# Altium PCB Main_PCB_V1R0_XXXXXX.PcbDoc
Units mil, origin at the board's own origin, x right, y up, seen from the top; angles counter-clockwise.
Board outline 6141.73 x 6929.13 mil, 2 copper layers (Top Layer, Bottom Layer), stack 52.66 mil thick; 72 components, 31 nets, 166 pads, 32 vias.
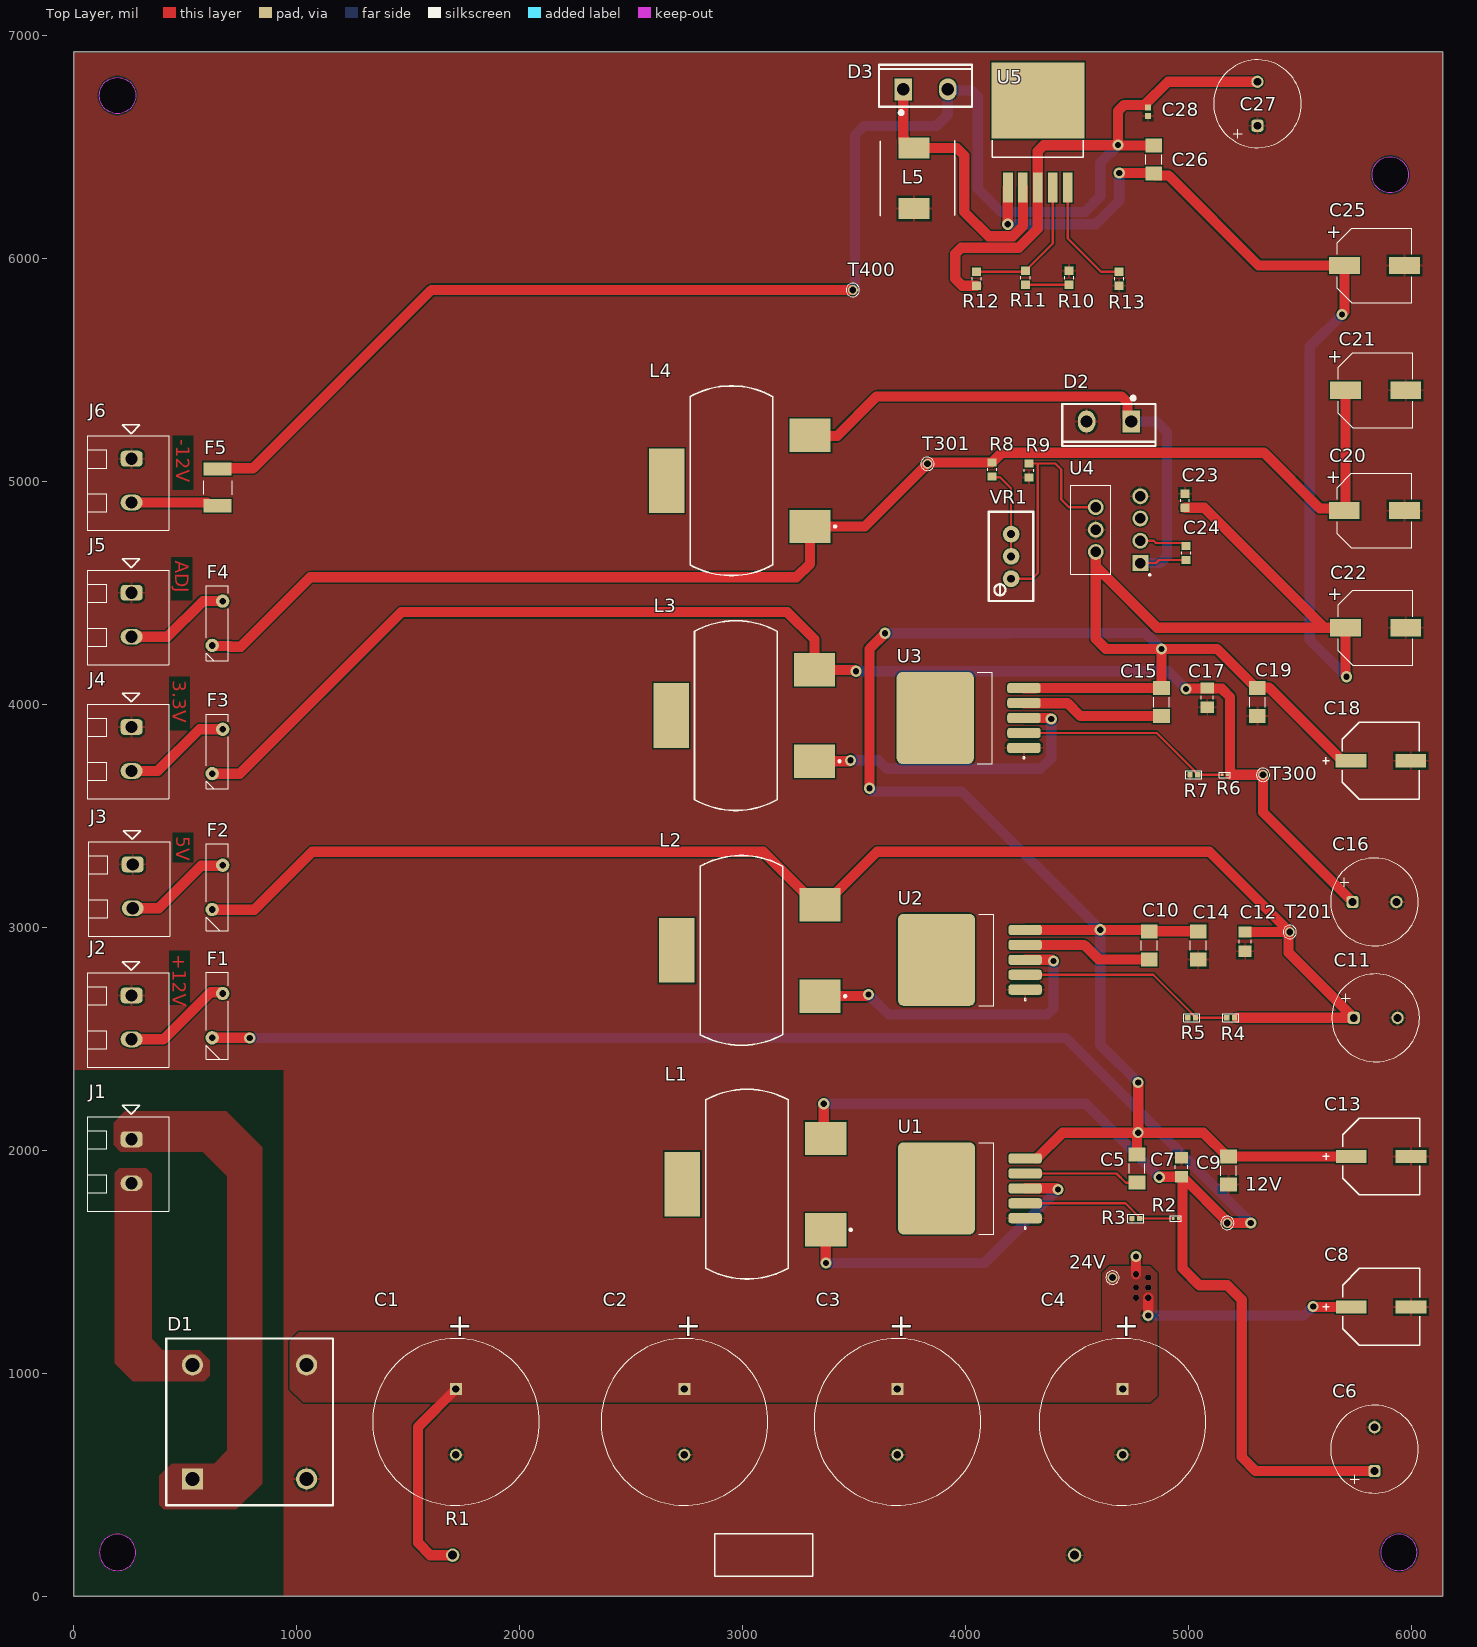
[diagram p0: Top Layer view]
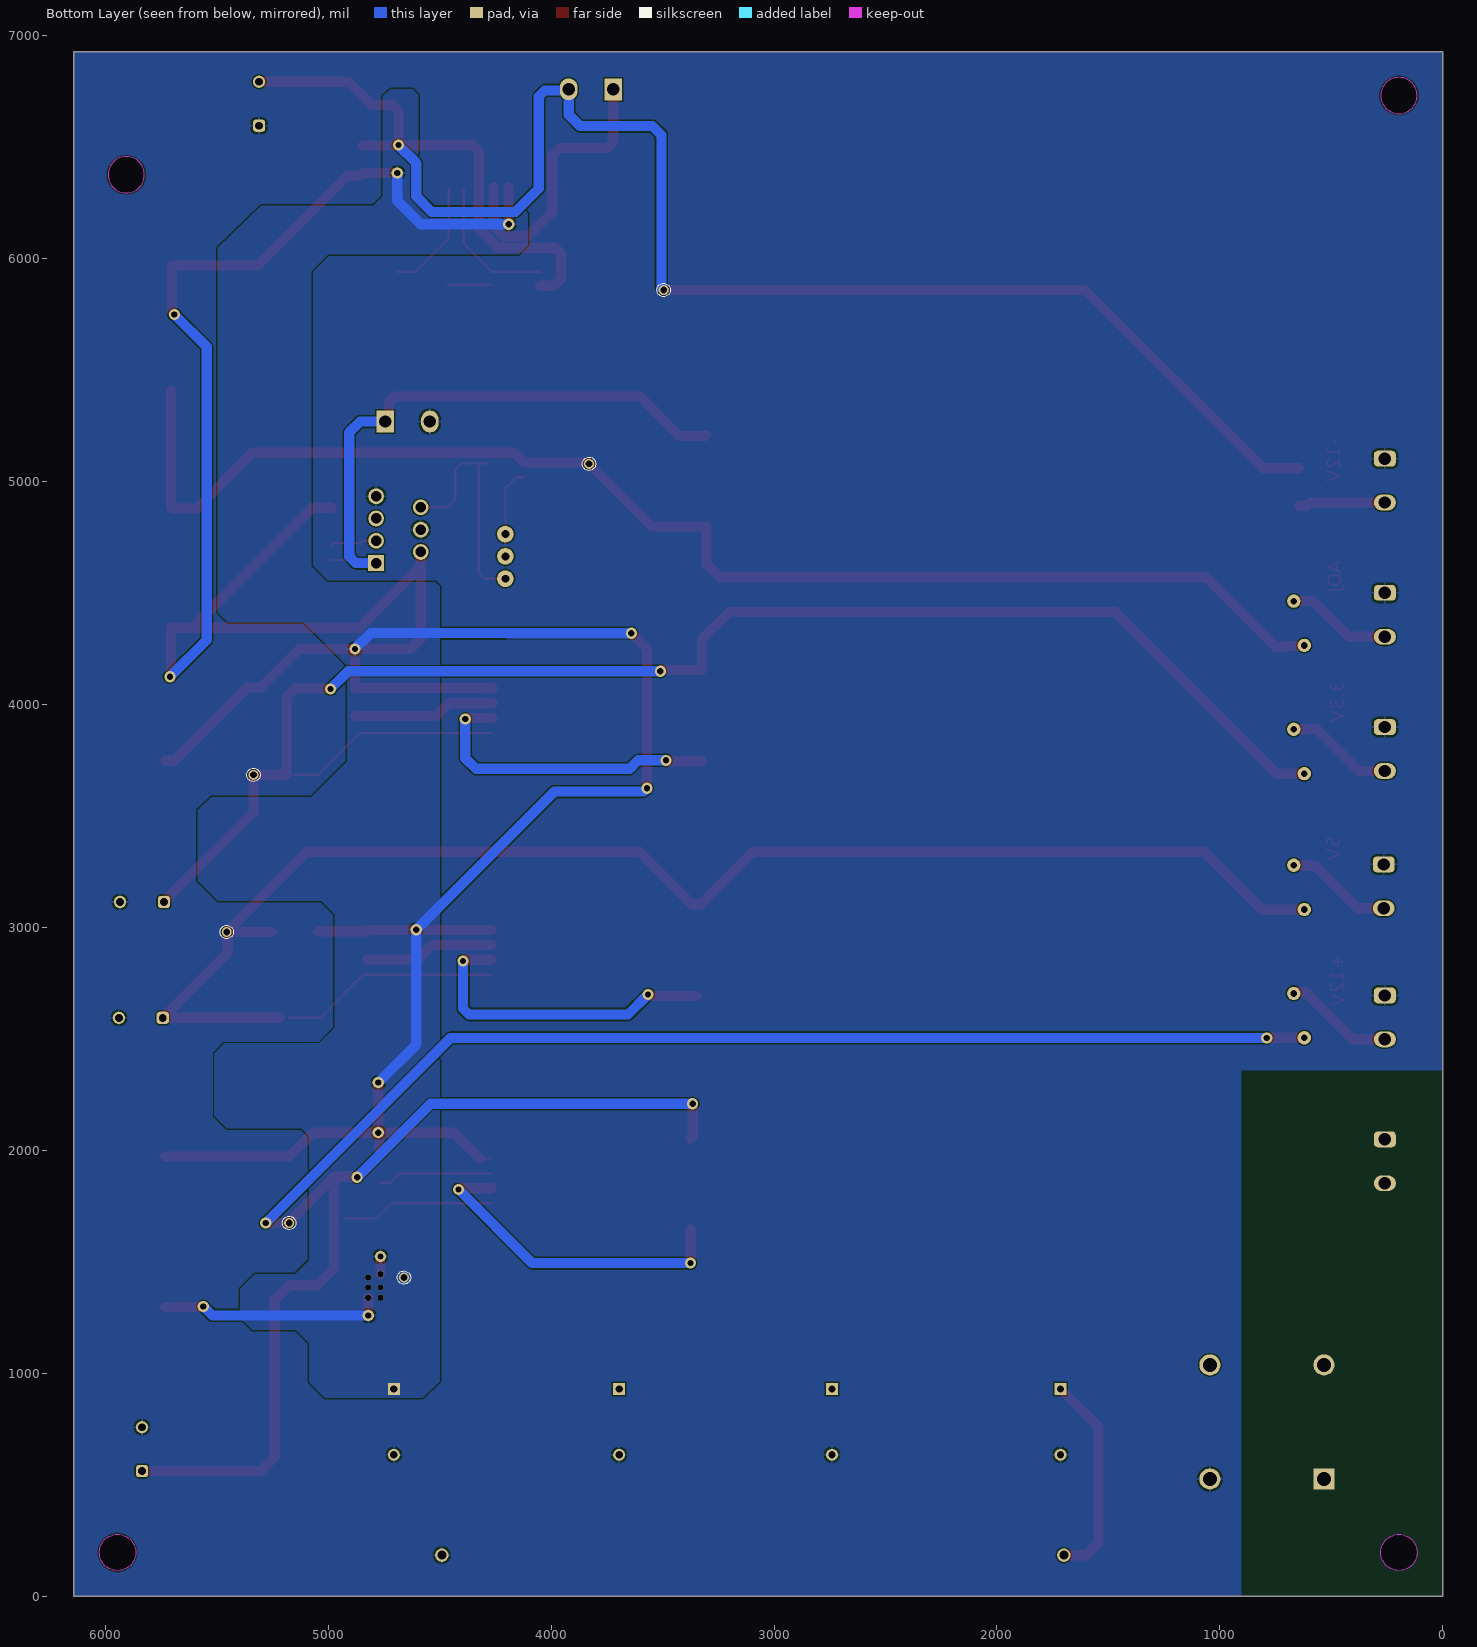
[diagram p1: Bottom Layer view, seen from below]
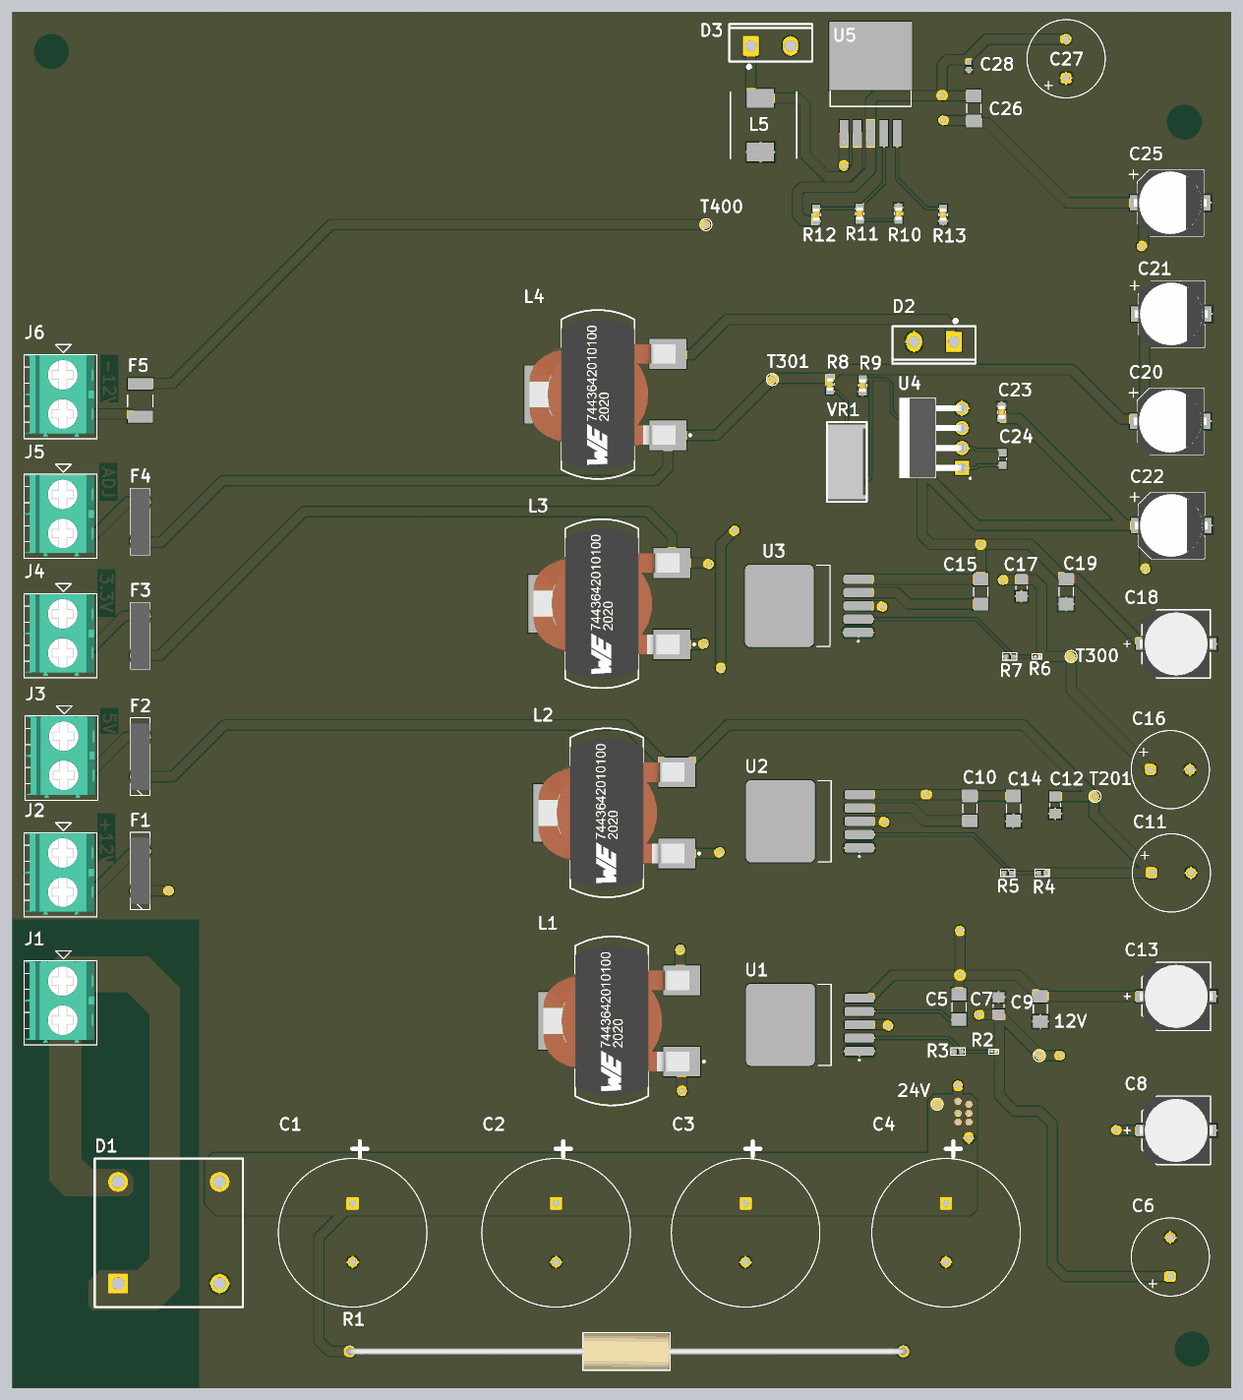
[diagram p2: 3D render of the assembled board from above, using the file's embedded part models]

## Layer stack, top to bottom
Top Solder: solder mask 0.4, Solder Resist, Dk 3.5
Top Layer: signal copper 1.18
Dielectric 1: dielectric 50.3, FR-4, Dk 4.8
Bottom Layer: signal copper 1.18
Bottom Solder: solder mask 0.4, Solder Resist, Dk 3.5

## Board outline
0,0 0,6929.13 6141.73,6929.13 6141.73,0
cut-out: 115.47,196.85 ccw(c196.85,196.85) 196.85,115.47 ccw(c196.85,196.85) 278.23,196.85 ccw(c196.85,196.85) 196.85,278.23 ccw(c196.85,196.85)
cut-out: 5863.5,196.85 ccw(c5944.88,196.85) 5944.88,115.47 ccw(c5944.88,196.85) 6026.26,196.85 ccw(c5944.88,196.85) 5944.88,278.23 ccw(c5944.88,196.85)
cut-out: 5905.47,6295.21 cw(c5905.47,6376.59) 5824.09,6376.59 cw(c5905.47,6376.59) 5905.47,6457.97 cw(c5905.47,6376.59) 5986.85,6376.59 cw(c5905.47,6376.59)
cut-out: 196.85,6650.91 cw(c196.85,6732.28) 115.47,6732.28 cw(c196.85,6732.28) 196.85,6813.66 cw(c196.85,6732.28) 278.23,6732.28 cw(c196.85,6732.28)

## Design rules (kind name [scope] priority, off if disabled: settings)
Clearance keep_out [OnLayer('Keep-Out Layer')] p1: gap=8 ignorepadtopadclearanceinfootprint=FALSE
Clearance [All] p2: gap=6 ignorepadtopadclearanceinfootprint=FALSE
HoleSize [All] p1: absolutevalues=TRUE maxlimit=100 minlimit=12 maxpercent=80.000 minpercent=20.000
MinimumSolderMaskSliver [All] p1: minsoldermaskwidth=4
PolygonConnect [All] p1: connectstyle=Relief reliefconductorwidth=10 reliefentries=4 polygonreliefangle="90 Angle" airgapwidth=10
RoutingVias [All] p1: holewidth=28 width=50 viastyle="Through Hole" minholewidth=28 minwidth=50 maxholewidth=28 maxwidth=50
SilkToSolderMaskClearance [IsPad] p1: minsilkscreentomaskgap=4 clearancetoexposedcopper=TRUE
SolderMaskExpansion [All] p1: expansion=4 istentingtop=FALSE
SupplyNets "Schematic Supply Nets_1" [InNet('GND')] p1: voltage=0.000
Width [All] p1: maxlimit=100 minlimit=6 preferedwidth=10
27 further rules are at their usual default settings.

## Classes and differential pairs
component class 000_Hierarchical: F1 F2 F3 F4 F5 J2 J3 J4 J5 J6
component class "DC-DC Converter": C15 C16 C17 C18 C19 C20 C21 C22 C23 C24 D2 L3 L4 R6 R7 R8 R9 T300 T301 U3 U4 VR1
component class "AC-DC Converter": C1 C2 C3 C4 D1 J1 R1 T? V?

## Components (designator, comment, footprint, x,y, rotation, side; value= is the part's Value field where it differs from the comment)
12V "TP_1P" TP_TH_30mil 5175,1675 r90 top (schematic designator T200)
24V "TP_1P" TP_TH_30mil 4660,1430 r90 top
C1 "50USC4700MEFCSN22X35" CAP_4700uF_50V 1715,782.5 r0 top value=4700uF
C2 "50USC4700MEFCSN22X35" CAP_4700uF_50V 2740,782.5 r0 top value=4700uF
C3 "50USC4700MEFCSN22X35" CAP_4700uF_50V 3695,782.5 r0 top value=4700uF
C4 "50USC4700MEFCSN22X35" CAP_4700uF_50V 4705,782.5 r0 top value=4700uF
C5 "1uF 100V" 1206 4770,1920 r270 top value=1uF
C6 "1000uF 25V" RADIAL-CAN_LSx5mm_Diax10mm_Hx14mm 5835.07,660 r90 top value=1000uF
C7 "1uF 25V" 0805 4970,1925 r90 top value=1uF
C8 "470uF 10V" RADIAL-CAN-SMD_DIAX8MM_HX10MM 5865,1300 r0 top value=470uF
C9 "1uF 100V" 1206 5180,1910 r270 top value=1uF
C10 "1uF 100V" 1206 4825,2920 r270 top value=1uF
C11 "1000uF 25V" RADIAL-CAN_LSx5mm_Diax10mm_Hx14mm 5840,2595 r0 top value=1000uF
C12 "1uF 25V" 0805 5255,2936.69 r270 top value=1uF
C13 "470uF 10V" RADIAL-CAN-SMD_DIAX8MM_HX10MM 5865,1975 r0 top value=470uF
C14 "1uF 100V" 1206 5045,2920 r270 top value=1uF
C15 "1uF 100V" 1206 4880,4011.51 r270 top value=1uF
C16 "1000uF 25V" RADIAL-CAN_LSx5mm_Diax10mm_Hx14mm 5834.65,3115 r0 top value=1000uF
C17 "1uF 25V" 0805 5085,4031.2 r270 top value=1uF
C18 "470uF 10V" RADIAL-CAN-SMD_DIAX8MM_HX10MM 5864.23,3750 r0 top value=470uF
C19 "1uF 100V" 1206 5310,4011.51 r270 top value=1uF
C20 "220uF 35V" RADIAL-CAN-SMD_Diax8mm_Hx10.2mm 5834.84,4870 r0 top value=220uF
C21 "220uF 35V" RADIAL-CAN-SMD_Diax8mm_Hx10.2mm 5840.07,5410 r0 top value=220uF
C22 "220uF 50V" RADIAL-CAN-SMD_Diax8mm_Hx10.2mm 5840.07,4345 r0 top value=220uF
C23 "0.47uF_50v" 0603 4985,4915 r90 top value=0.47uF
C24 "15nF 50V" 0603_1.4mm 4990,4680 r270 top value=15nF
C25 "220uF 50V" RADIAL-CAN-SMD_Diax8mm_Hx10.2mm 5835.07,5970 r0 top value=220uF
C26 "100nF 100V" 1206 4845,6445 r90 top value=100nF
C27 "1000uF 25V" RADIAL-CAN_LSx5mm_Diax10mm_Hx14mm 5310,6695 r90 top value=1000uF
C28 "100nF 25V" 0402_RF 4820,6659.5 r90 top value=0.1uF
D1 "KBPC1510" KBPC8 795,763.48 r0 top
D2 "MBR1060" D_Schottky_60V_10A_TO 4640,5265 r270 top value=60V
D3 "MBR1060" D_Schottky_60V_10A_TO 3825,6765 r90 top value=60V
F1 "16V 5A" FUSE_RADIAL_14.20X10.00X2.50mm 645,2605 r90 top
F2 "16V 5A" FUSE_RADIAL_14.20X10.00X2.50mm 645,3180.59 r90 top
F3 "16V 4A" FUSE_RADIAL_12.80X8.40X2.50mm 645,3790 r90 top
F4 "16V 4A" FUSE_RADIAL_12.80X8.40X2.50mm 645,4365 r90 top
F5 "16V 1.6A" 1812 645,4975 r270 top
J1 "2P  5mm" CON_2x1_TH_5mm 260,1951.57 r270 top
J2 "2P  5mm" CON_2x1_TH_5mm 260,2597 r270 top
J3 "2P  5mm" CON_2x1_TH_5mm 265,3185 r270 top
J4 "2P  5mm" CON_2x1_TH_5mm 260,3801 r270 top
J5 "2P  5mm" CON_2x1_TH_5mm 260,4403 r270 top
J6 "2P  5mm" CON_2x1_TH_5mm 260,5005 r270 top
L1 "FIXED IND 47UH 12A 12.2 MOHM SMD" L_47uH_12A 3020.59,1849.31 r90 top value=47uH
L2 "FIXED IND 47UH 12A 12.2 MOHM SMD" L_47uH_12A 2995.59,2897.64 r90 top value=47uH
L3 "FIXED IND 47UH 12A 12.2 MOHM SMD" L_47uH_12A 2970.59,3950.97 r90 top value=47uH
L4 "FIXED IND 47UH 12A 12.2 MOHM SMD" L_47uH_12A 2950.59,5004.31 r90 top value=47uH
L5 "100uH 2.5A" L_2SMD_8x8.5x5MM_NS 3770,6496.65 r270 top value=100uH
R1 "" Res_2K2_2W_TH 4490,185 r180 top value=2k2
R2 "13k 1/20W" 0201 4945,1695 r0 top value=13k
R3 "1k5 1/16W" 0402 4765,1695 r0 top value=1k5
R4 "10k 1/16W" 0402 5190,2595 r0 top value=10k
R5 "3k3 1/16W" 0402 5015,2595 r0 top value=3k3
R6 "2k 1/20W" 0201 5165,3685 r0 top value=2k
R7 "3k3 1/16W" 0402 5025,3685 r0 top value=3k3
R8 "50R 1/18W" 0603 4120,5055 r90 top value=50R
R9 "1k8 1/10W" 0603 4285,5050 r90 top value=1k8
R10 "1/10W" 0603 4465,5915 r90 top value=8K2
R11 "560R 1/10W" 0603 4270,5915 r270 top value=560R
R12 "1k 1/10W" 0603 4050,5910 r90 top value=1k
R13 "1k 1/10W" 0603 4690,5910 r90 top value=1k
T201 "TP_1P" TP_TH_30mil 5455,2980 r90 top
T300 "TP_1P" TP_TH_30mil 5335,3685 r90 top
T301 "TP_1P" TP_TH_30mil 3830,5080 r270 top
T400 "TP_1P" TP_TH_30mil 3495,5860 r90 top
U1 "XL4016" TO-263-5 4069.21,1830.14 r180 top
U2 "XL4016" TO-263-5 4069.21,2855.14 r180 top
U3 "XL4016" TO-263-5 4063.82,3940 r180 top
U4 "LM2678-ADJ (TO-263)" DCDC_ADJ_5A_TO263-7 4650,4790 r90 top
U5 "LM2596HV_ADJ" LM2596HVS-ADJ 4325,6710 r0 top
VR1 "20k 1/2W" Pot_3x1_2.54mm_TH_TM 4205,4665 r90 top value=20k

## Footprints (in the part's own frame and the unit in brackets; to place one, negate y for a bottom-side part, rotate by r counter-clockwise, add the part's x,y. Pads: shape width x height; smd on the part's side, far side on the other; paste and mask are expansions set on the pad)
0201 [mm] "20211214 / A-F.Romo"
  rect 0.3x0.3 smd: 1(-0.325,0) 2(0.275,0)
  silkscreen extent -0.65,-0.32 0.61,0.33, body extent -0.32,-0.17 0.32,0.17, height 0.27
0402 [mm] "1005 Metric / 20190222 / N-A.Potosi"
  rect 0.6x0.6 smd: 1(-0.45,0) 2(0.45,0)
  silkscreen extent -0.92,-0.47 0.92,0.47, body extent -0.5,-0.25 0.5,0.25, height 0.25
0402_RF [mil] "1005 Metric / 20190221 / C-A.Serna.A"
  rect 27x27 smd: 1(-19.5,0) 2(19.5,0)
  body extent -20,-10 19,10, height 22
0603 [mil] "1608 Metric / 20190221 / C-A.Serna.A"
  rect 37x40 smd: 1(-31.5,0) 2(31.5,0)
  silkscreen extent -6,-20 6,20, body extent -31,-16 32,16, height 12
0603_1.4mm [mil] "1608 Metric/20230206/J-A.Sepulveda"
  rect 37x40 smd: 1(-31.5,0) 2(31.5,0)
  silkscreen extent -7,-20 6,20, body extent -31,-16 31,16, height 59
0805 [mm] "2012 Metric / 20190221 / C-A.Serna.A"
  rect 1.3x1.5 smd: 1(-1.1,0) 2(1.1,0)
  silkscreen extent -0.2,-0.7 0.2,0.7, body extent -1.13,-0.7 1.07,0.7, height 1
1206 [mm] "3216 Metric / 20190221 / C-A.Serna.A"
  rect 1.6x1.9 smd: 1(-1.6,0) 2(1.6,0)
  silkscreen extent -0.55,-0.9 0.57,0.9, body extent -1.6,-0.8 1.6,0.8, height 2
1812 [mm] "4532 Metric / 20190321 / N-A.Potosi"
  rect 1.5x3.2 smd: 1(-2.1,0) 2(2.1,0)
  silkscreen extent -0.73,-1.63 0.83,1.63, body extent -2.28,-1.62 2.28,1.62, height 0.85
CAP_4700uF_50V [mm] "CAP ALUM 4700uF ±20% 50V TH"
  rect 1.358x1.358 hole 0.85: 1(0,3.75)
  round 1.358 hole 0.85: 2(0,-3.75)
  silkscreen extent -9.5,-9.5 9.5,9.5
CON_2x1_TH_5mm [mm] "/ 20201015 / C-A.Serna.A"
  rrect50% 1.8x2.5 hole 1.397: 1(-2.5,0)
  oval 1.8x2.5 hole 1.397: 2(2.5,0)
  silkscreen extent -6.36,-5.08 5.68,4.23, body extent -5,-5.1 5.4,3.9, height 11.41
D_Schottky_60V_10A_TO [mm] "DIODE SCHOTTKY 60V TO-220AC-2"
  rect 2.5x2 hole 1.4: 1(-0.124,2.634)
  oval 2.5x2 hole 1.4: 2(-0.124,-2.446)
  silkscreen extent -2.99,-5.21 2.67,5.4
DCDC_ADJ_5A_TO263-7 [mm] "IC REG BUCK ADJ 5A TO220-7"
  rect 1.8x1.8 / inner round 1.8 / far side rect 1.8x1.8 hole 1.2: 1(-3.937,-3.429)
  round 1.8 hole 1.2: 2(-2.667,1.651) 3(-1.397,-3.429) 4(-0.127,1.651) 5(1.143,-3.429) 6(2.413,1.651) 7(3.683,-3.429)
  silkscreen extent -5.38,-4.6 4.95,4.51, body extent -5.21,-3.62 4.95,4.52, height 20.9
FUSE_RADIAL_12.80X8.40X2.50mm [mil] "/ 20190926 / C-D Viveros"
  round 60 hole 30: 1(-99.41,23.62) 2(99.41,-23.62)
  silkscreen extent -167,-49 167,49, body extent -167,-49 167,49, height 472
FUSE_RADIAL_14.20X10.00X2.50mm [mil] "/ 20191021 / C-D Viveros"
  round 60 hole 30: 1(-99.41,23.62) 2(99.41,-23.62)
  silkscreen extent -195,-49 195,49, body extent -195,-49 195,49, height 559
KBPC8 [mm] "BRIDGE RECT 1kV 15A KBPC"
  rect 2.4x2.4 hole 1.6 paste-2539.97 mask+0.051: 1(-6.652,-6.017)
  round 2.4 hole 1.6 paste-2539.97 mask+0.051: 2(-6.652,6.983) 3(6.348,6.983) 4(6.348,-6.017)
  silkscreen extent -9.65,-9.02 9.35,9.98
L_2SMD_8x8.5x5MM_NS [mm] "NS Inductor/20230724/L-A.Rodriguez"
  rect 2.4x3.5 smd: 1(0,0) 2(6.9,0)
  silkscreen extent -0.79,-3.86 7.69,4.62, body extent -0.8,-3.6 7.7,4.4, height 5
L_47uH_12A [mm] "/ 23102026 / Y.Gonzalez"
  rect 3.8x4.7 smd: 1(-5.21,-8.96) 2(5.2,-8.96)
  rect 7.37x4.06 smd: 3(0,7.36)
  silkscreen extent -10.81,-11.94 10.81,4.7, body extent -9.66,-9.95 9.66,8.75, height 9.42
LM2596HVS-ADJ [mm] "60V/3A/150kHz Step-Down Switching Regulator"
  rect 1.1x3.4 smd: 1(-3.4,-9.906) 2(-1.7,-9.906) 3(0,-9.906) 4(1.7,-9.906) 5(3.4,-9.906)
  rect 10.587x8.705 smd: 6(0,0)
  silkscreen extent -5.17,-6.47 5.17,-4.5
Pot_3x1_2.54mm_TH_TM [mil] "/20201120/C-A.Serna.A"
  round 75 hole 35: 1(-100,0) 2(0,0) 3(100,0)
  silkscreen extent -200,-100 200,100, body extent -187,-95 187,95, height 455
RADIAL-CAN-SMD_Diax8mm_Hx10.2mm [mm] "20190503/J-P.Vargas.A"
  rect 3.5x1.95 smd: 1(-3.425,0) 2(3.425,0)
  silkscreen extent -4.25,-4.25 4.25,4.25, body extent -4.65,-4.25 4.65,4.25, height 10.8
RADIAL-CAN-SMD_DIAX8MM_HX10MM [mil] "/20221117/J-A.Sepulveda"
  rect 138x59 smd: 1(-134.15,-1.74) 2(133.85,-1.74)
  silkscreen extent -262,-174 172,171, body extent -183,-169 183,166, height 407
RADIAL-CAN_LSx5mm_Diax10mm_Hx14mm [mil] "/ 20190221 / C-A.Serna.A"
  rrect50% 55x55 hole 35: 1(-98,0)
  round 55 hole 35: 2(98.85,0)
  silkscreen extent -196,-197 197,197, body extent -196,-197 197,197, height 551
Res_2K2_2W_TH [mil] "RES 2.2kΩ ±5% 2W Through Hole,D4.5xL11mm"
  round 60 hole 40 paste-99999 mask+0: 1(0,0) 2(2790,0)
  silkscreen extent 1175,-95 1615,95, body extent -15,-89 2805,89, height 180
TO-263-5 [mm] "P2PAK-4, D2Pak, TO-263BA / 20190617/ M-X.Arias"
  rrect50% 3.8x1.15 smd: 1(-5.05,3.4) 2(-5.05,1.7) 3(-5.05,0) 4(-5.05,-1.7) 5(-5.05,-3.4)
  rrect15% 8.8x10.5 smd: 6(5.05,0)
  silkscreen extent -5.17,-5.2 0.25,5.2, body extent -1.35,-5.17 8.03,5.23, height 4.8
TP_TH_30mil [mil] "/ 20190222 / C-A.Serna.A"
  round 45 hole 30: 1(0,0)
  silkscreen extent -30,-30 30,30

## Part data
12V 24V T201 T300 T301 T400: library part TP_TH_30mil, "Test point 30mil hole size", Last modified by=J.Jaramillo, Last modified date=20240310
C1 C2 C3 C4: library part CAP_4700uF_50V, "CAP ALUM 4700uF ±20% 50V TH", Manufacturer=Rubycon, Supplier Part Number 1=C338224, ComponentLink1Description=datasheet, ComponentLink1URL=https://www.lcsc.com/datasheet/C338224.pdf, ComponentLink2Description=LCSC, ComponentLink2URL=https://www.lcsc.com/product-detail/C338224.html?s_z=n_q_t_4700%25C2%25B5F%2520%252050V, Last modified by=Y.Gonzalez, Last modified date=24102026, Manufacturer Part Number=50USC4700MEFCSN22X35, Parameter 4=C338224, Supplier 1=LCSC
C5 C9 C10 C14 C15 C19: library part Cap_1uF_1206_100V, "CAP CER 1UF 100V X7R 1206", Manufacturer="Samsung Electro-Mechanics", Manufacturer Part Number=CL31B105KCHSNNE, Supplier Part Number 1=1276-2747-1-ND, ComponentLink1Description=Digi-Key, ComponentLink1URL=https://www.digikey.com/en/products/detail/samsung-electro-mechanics/CL31B105KCHSNNE/3888405, Last modified by=J.Jaramillo, Last modified date=20240309, Supplier 1=Digi-Key
C6 C11 C16 C27: library part Cap_1000uF_25V_ALU_THT, "CAP 1000uf/25V,10*16,105℃ RADIAL", Manufacturer=SamXon, Manufacturer Part Number="KM 1000U/25V", Last modified by=J.Jaramillo, Last modified date=20240309, Supplier 1=Poshton, Supplier Part Number 1="KM 1000U/25V"
C7 C12 C17: library part Cap_1uF_0805_25V, "CAP CER 1UF 25V X7R 0805", Manufacturer=Yageo, Manufacturer Part Number=CC0805KKX7R8BB105, Supplier Part Number 1=311-1456-1-ND, ComponentLink1Description=Digi-Key, ComponentLink1URL=https://www.digikey.com/product-detail/en/yageo/CC0805KKX7R8BB105/311-1456-1-ND/2833762, Last modified by=J.Jaramillo, Last modified date=20240309, Supplier 1=Digi-Key
C8 C13 C18: library part Cap_470uF_10V_ALU_SMD, "470uF 10V ±20% SMD,D8xL10mm Aluminum Electrolytic Capacitors", Manufacturer=Lelon, Manufacturer Part Number=VZH471M1ATT-0810L, Supplier Part Number 1=C723180, ComponentLink1Description=LCSC, ComponentLink1URL=https://lcsc.com/product-detail/Aluminum-Electrolytic-Capacitors-SMD_Lelon-VZH471M1ATT-0810L_C723180.html, Last modified by=J.Jaramillo, Last modified date=20240309, Supplier 1=LCSC
C20 C21: library part Cap_220uF_35V_ALU_SMD, "CAP ALUM 220UF 20% 35V SMD", Manufacturer="Panasonic Electronic Components", Manufacturer Part Number=EEE-1VA221UP, Supplier Part Number 1=PCE3955CT-ND, ComponentLink1Description=Digi-Key, ComponentLink1URL=https://www.digikey.com/products/en?keywords=PCE3955CT-ND, Last modified by=J.Jaramillo, Last modified date=20240309, Reel stock=N/A, Supplier 1=Digi-Key
C22 C25: library part Cap_220uF_50V_ALU_SMD, "CAP ALUM 220UF 20% 50V SMD", Manufacturer=Panasonic, Manufacturer Part Number=EEE-FT1H221AP, Supplier Part Number 1=667-EEE-FT1H221AP, ComponentLink1Description=Mouser, ComponentLink1URL=https://www.mouser.com/ProductDetail/Panasonic/EEE-FT1H221AP?qs=CMJjuEs1%252BuFFGBuxQbDfDA==, Last modified by=J.Jaramillo, Last modified date=20240309, Reel stock=N/A, Supplier 1=Mouser
C23: library part Cap_0.47uF_0603_50V, "CAP CER 0.47UF 50V X5R 0603", Manufacturer="Taiyo Yuden", Manufacturer Part Number=UMK107ABJ474KA-T, Supplier Part Number 1=587-3171-1-ND, ComponentLink1Description=Digi-Key, ComponentLink1URL=https://www.digikey.com/en/products/detail/taiyo-yuden/UMK107ABJ474KA-T/3194980?s=N4IgTCBcDaIKwA4DsBaAzARiRlOByAIgAQgC6AvkA, Last modified by=J.Jaramillo, Last modified date=20240309, Supplier 1=Digi-Key
C24: library part Cap_0.015uF_0603_50V, "CAP CER 0.015UF 50V X7R 0603", Manufacturer="Samsung Electro-Mechanics", Manufacturer Part Number=CL10B153KB8NNNC, Supplier Part Number 1=1276-1277-1-ND, ComponentLink1Description=Digi-Key, ComponentLink1URL=https://www.digikey.com/en/products/detail/samsung-electro-mechanics/CL10B153KB8NNNC/3886935?s=N4IgTCBcDaIMIBkCMAGAQkgrAZgNJoA4A5EuEAXQF8g, Last modified by=J.Jaramillo, Last modified date=20240309, Supplier 1=Digi-Key
C26: library part Cap_0.1uF_1206_100V, "CAP CER 0.1UF 100V X7R 1206", Manufacturer="Samsung Electro-Mechanics", Manufacturer Part Number=CL31B104KCFNNNE, Supplier Part Number 1=1276-1151-1-ND, ComponentLink1Description=Digi-Key, ComponentLink1URL=https://www.digikey.com/en/products/detail/samsung-electro-mechanics/CL31B104KCFNNNE/3886809, Last modified by=J.Jaramillo, Last modified date=20240309, Supplier 1=Digi-Key
C28: library part Cap_0.1uF_0402_25V, "CAP CER 0.1UF 25V X7R 0402", Manufacturer=Yageo, Manufacturer Part Number=CC0402KRX7R8BB104, Supplier Part Number 1=311-2077-1-ND, ComponentLink1Description=Digi-key, ComponentLink1URL=https://www.digikey.com/products/en?keywords=311-2077-1-ND, Last modified by=J.Jaramillo, Last modified date=20240309, Supplier 1=Digi-Key
D1: library part BR_KBPC_1kV_15A, "BRIDGE RECT 1kV 15A KBPC", Manufacturer=YFW, Supplier Part Number 1=LCSC, ComponentLink1Description=LCSC, ComponentLink1URL=https://www.lcsc.com/product-detail/C19273102.html?s_z=n_q_KBPC1510, ComponentLink2Description=DATASHEET, ComponentLink2URL=https://www.lcsc.com/datasheet/C19273102.pdf, Last modified by=Y.Gonzalez, Last modified date=24102026, Manufacturer Part Numbers=KBPC1510, Supplier 1=C19273102
D2 D3: library part D_Schottky_60V_10A_TO, "DIODE SCHOTTKY 60V TO-220AC-2", Manufacturer=SMC, Supplier Part Number 1=C260256, ComponentLink1Description=LCSC, ComponentLink1URL=https://www.lcsc.com/product-detail/C260256.html?s_z=n_q_x_MBR1060, ComponentLink2Description=Datasheet, ComponentLink2URL=https://www.lcsc.com/datasheet/C260256.pdf, Last modified by=Y.Gonzalez, Last modified date=25102026, Manufacturer Part Number 1=MBR1060, Supplier=LCSC
F1 F2: library part F_5A_16V_PTC, "PTC RESET FUSE 16V 5A RADIAL", Manufacturer="Littelfuse Inc.", Manufacturer Part Number=RGEF500, Supplier Part Number 1=RGEF500HF-ND, ComponentLink1Description=Digi-key, ComponentLink1URL=https://www.digikey.com/product-detail/en/littelfuse-inc/RGEF500/RGEF500HF-ND/5029781, Last modified by=J.Jaramillo, Last modified date=20240309, Reel Sotck=N/A, Supplier 1=Digi-Key
F3 F4: library part F_4A_16V_PTC, "PTC RESET FUSE 16V 4A RADIAL", Manufacturer="Littelfuse Inc.", Manufacturer Part Number=RGEF400, Supplier Part Number 1=RGEF400HF-ND, ComponentLink1Description=Digi-key, ComponentLink1URL=https://www.digikey.com/product-detail/en/littelfuse-inc/RGEF400/RGEF400HF-ND/5130245, Last modified by=J.Jaramillo, Last modified date=20240309, Reel Sotck=N/A, Supplier 1=Digi-Key
F5: library part F_1.6A_16V_PTC, "PTC RESET FUSE 16V 1.6A 1812", Manufacturer="Bel Fuse Inc.", Manufacturer Part Number=0ZCG0160BF2C, Supplier Part Number 1=507-1776-1-ND, ComponentLink1Description=Digi-Key, ComponentLink1URL=https://www.digikey.com/product-detail/en/bel-fuse-inc/0ZCG0160BF2C/507-1776-1-ND/4156320, Last modified by=J.Jaramillo, Last modified date=20240309, Reel Sotck=N/A, Supplier 1=Digi-Key
J1 J2 J3 J4 J5 J6: library part Con_2x1_TH_5mm, "TERM BLK 2POS SIDE ENTRY 5MM PCB", Manufacturer="Phoenix Contact", Manufacturer Part Number=1935161, Supplier Part Number 1=277-1667-ND, ComponentLink1Description=Digi-key, ComponentLink1URL=https://www.digikey.com/en/products/detail/phoenix-contact/1935161/568614, Last modified by=J.Jaramillo, Last modified date=20240310, Reel stock=N/A, Supplier 1=Digi-Key
L1 L2 L3 L4: library part L_47uH_12A, Manufacturer="Würth Elektronik", Manufacturer Part Number=7443634700, Supplier Part Number 1=732-2525-1-ND, Last modified by=Y.Gonzalez, Last modified date=23102026, Reel stock=N/A, Supplier 1=Digi-Key
L5: library part L_100uH_2.5A_NS, "2.5A 100uH ±20% 3A SMD,8x8.5mm Power Inductors ROHS", Manufacturer="PROD Tech", Manufacturer Part Number=PSPMAA0805-101M-ANP, Supplier Part Number 1=C2962892, ComponentLink1Description=Digi-Key, ComponentLink1URL=https://www.digikey.com/en/products/detail/bourns-inc/SRR1280-101M/2127044, Last modified by=J.Jaramillo, Last modified date=20240310, Reel stock=N/A, Supplier 1=LCSC
R1: library part Res_2K2_2W_TH, "RES 2.2kΩ ±5% 2W Through Hole,D4.5xL11mm", Manucfacturer Part Number 1=RSMF2JT2K20, Manufacturer="SEI(Stackpole Electronics Inc.)", Supplier Part Number 1=C2584336, ComponentLink1Description=Datasheet, ComponentLink1URL=https://datasheet.octopart.com/RSMF2JT2K20-Stackpole-Electronics-datasheet-170576583.pdf, ComponentLink2Description=Ultralibrarian, ComponentLink2URL=https://app.ultralibrarian.com/details/3be72d1d-bf55-11e9-ab3a-0a3560a4cccc/Stackpole-International/RSMF2JT2K20?uid=19230567&exports=41, Last modified by=Y.Gonzalez, Last modified date=25102026, Supplier=LCSC
R2: library part Res_13k_0201_1/20W, "RES SMD 13K OHM 1% 1/20W 0201", Manufacturer=YAGEO, Manufacturer Part Number=AC0201FR-0713KL, Supplier Part Number 1=YAG5154CT-ND, ComponentLink1Description=Digi-Key, ComponentLink1URL=https://www.digikey.com/en/products/detail/yageo/AC0201FR-0713KL/5894273?s=N4IgTCBcDaIJoEEDiBWAjCgLAYQCoFoA5AERAF0BfIA, Last modified by=J.Jaramillo, Last modified date=20240310, Reel stock=N/A, Supplier 1=DIGI-KEY
R3: library part Res_1K5_0402_1/16W, "RES SMD 1.5K OHM 5% 1/16W 0402", Manufacturer=Yageo, Manufacturer Part Number=RC0402JR-071K5L, Supplier Part Number 1=311-1.5KJRCT-ND, ComponentLink1Description=Link, ComponentLink1URL=https://www.digikey.com/product-detail/en/yageo/RC0402JR-071K5L/311-1-5KJRCT-ND/729359, Last modified by=J.Jaramillo, Last modified date=20240310, Reel stock=N/A, Supplier 1=Digi-Key
R4: library part Res_10k_0402_1/16W, "RES SMD 10K OHM 1% 1/16W 0402", Manufacturer=Yageo, Manufacturer Part Number=RC0402FR-0710KL, Supplier Part Number 1=311-10.0KLRCT-ND, ComponentLink1Description=Digi-Key, ComponentLink1URL=https://www.digikey.com/en/products/detail/yageo/RC0402FR-0710KL/726523?s=N4IgTCBcDaIEoGEAMAWJYBicC0SDsAjEgNIAyIAugL5A, Last modified by=J.Jaramillo, Last modified date=20240310, Reel stock=N/A, Supplier 1=Digi-Key
R5 R7: library part Res_3k3_0402_1/16W, "RES SMD 3.3K OHM 5% 1/16W 0402", Manufacturer=Yageo, Manufacturer Part Number=RC0402JR-073K3L, Supplier Part Number 1=311-3.3KJRCT-ND, ComponentLink1Description=Digi-Key, ComponentLink1URL=https://www.digikey.com/product-detail/en/yageo/RC0402JR-073K3L/311-3-3KJRCT-ND/729403, Last modified by=J.Jaramillo, Last modified date=20240310, Reel stock=N/A, Supplier 1=Digi-Key
R6: library part Res_2k_0201_1/20W, "RES SMD 2K OHM 1% 1/20W 0201", Manufacturer="Vishay Dale", Manufacturer Part Number=CRCW02012K00FNED, Supplier Part Number 1=541-2.00KABCT-ND, ComponentLink1Description=Digi-Key, ComponentLink1URL=https://www.digikey.com/en/products/detail/vishay-dale/CRCW02012K00FNED/1199840?s=N4IgTCBcDaIKwBYCMBaMA6ADJg0gQQCEBhAFRQDkAREAXQF8g, Last modified by=J.Jaramillo, Last modified date=20240310, Reel stock=N/A, Supplier 1=Digi-Key
R8: library part Res_50R_0603_1/18W, "RES SMD 50 OHM 0.1% 1/8W 0603", Manufacturer="Vishay Thin Film", Manufacturer Part Number=FC0603E50R0BST1, Supplier Part Number 1=FC0603-50BWCT-ND, ComponentLink1Description=Digi-Key, ComponentLink1URL=https://www.digikey.com/product-detail/en/vishay-thin-film/FC0603E50R0BST1/FC0603-50BWTR-ND/1769755, Last modified by=J.Jaramillo, Last modified date=20240310, Reel stock=N/A, Supplier 1=Digi-Key
R9: library part Res_1k8_0603_1/10W, "RES 1.8K OHM 1% 1/10W 0603", Manufacturer="Stackpole Electronics Inc", Manufacturer Part Number=RMCF0603FT1K80, Supplier Part Number 1=RMCF0603FT1K80CT-ND, ComponentLink1Description=Digi-Key, ComponentLink1URL=https://www.digikey.com/product-detail/en/stackpole-electronics-inc/RMCF0603FT1K80/RMCF0603FT1K80CT-ND/1943005, Last modified by=J.Jaramillo, Last modified date=20240310, Reel stock=N/A, Supplier 1=Digi-Key
R10: library part Res_8k2_0603_1/10W, "RES SMD 8.2K OHM 1% 1/10W 0603", Manufacturer=Yageo, Manufacturer Part Number=AC0603FR-078K2L, Supplier Part Number 1=YAG3634CT-ND, ComponentLink1Description=Digi-Key, ComponentLink1URL=https://www.digikey.com/en/products/detail/yageo/AC0603FR-078K2L/5896322, Last modified by=J.Jaramillo, Last modified date=20240310, Reel stock=N/A, Supplier 1=Digi-Key
R11: library part Res_560R_0603_1/10W, "RES SMD 560 OHM 1% 1/10W 0603", Manufacturer=Yageo, Manufacturer Part Number=RC0603FR-07560RL, Supplier Part Number 1=311-560HRCT-ND, ComponentLink1Description=Digi-key, ComponentLink1URL=https://www.digikey.com/product-detail/en/yageo/RC0603FR-07560RL/311-560HRCT-ND/730251, Last modified by=J.Jaramillo, Last modified date=20240310, Reel stock=N/A, Supplier 1=Digi-Key
R12 R13: library part Res_1k_0603_1/10W, "RES SMD 1K OHM 1% 1/10W 0603", Manufacturer=Yageo, Manufacturer Part Number=RC0603FR-071KL, Supplier Part Number 1=311-1.00KHRCT-ND, ComponentLink1Description=Digi-Key, ComponentLink1URL=https://www.digikey.com/product-detail/en/yageo/RC0603FR-071KL/311-1-00KHRCT-ND/729790, Last modified by=J.Jaramillo, Last modified date=20240310, Reel stock=N/A, Supplier 1=Digi-Key
U1 U2 U3: library part DCDC_ADJ_12A_TO-220-5L, "180 KHz fixed frequency PWM buck (step-down) DC/DC converter, capable of driving a 12A load with high efficiency", Manufacturer=XLSEMI, Supplier Part Number 1=C55881, ComponentLink1Description=LCSC, ComponentLink1URL=https://www.lcsc.com/product-detail/C55881.html, ComponentLink2Description=Datasheet, ComponentLink2URL=https://www.snapeda.com/parts/XL4016/XLSEMI/datasheet/, Last modified by=Y.Gonzalez, Last modified date=22102026, Manufacturer Part Number=XL4016, Reel stock=N/A, Supplier 1=LCSC
U4: library part DCDC_ADJ_5A_TO263-7, "IC REG BUCK ADJ 5A TO220-7", Manufacturer="Texas Instruments", Manufacturer Part Number=296-43516-5-ND, Supplier Part Number 1=LM2678T-ADJ, ComponentLink1Description=DigiKey, ComponentLink1URL=https://www.digikey.com/es/products/detail/texas-instruments/LM2678T-ADJ/3695077, ComponentLink2Description=datasheet, ComponentLink2URL=https://www.ti.com/lit/ds/symlink/lm2678.pdf?HQS=dis-dk-null-digikeymode-dsf-pf-null-wwe&ts=1792805774583, Last modified by=Y.Gonzalez, Last modified date=23102026, Reel stock=N/A, Supplier 1=Digi-Key
U5: library part LDO_12V0_1A_TO263-5, "60V/3A/150kHz Step-Down Switching Regulator", Manufacturer="TECH PUBLIC", Manufacturer Part Number 1=LM2596HVS-ADJ, Supplier Part Number 1=C18221477, ComponentLink1Description=Datasheet, ComponentLink1URL=https://www.lcsc.com/datasheet/C18221477.pdf, ComponentLink2Description=LCSC, ComponentLink2URL=https://www.lcsc.com/product-detail/C18221477.html?s_z=n_q_lm2596hv, Last modified by=Y.Gonzalez, Last modified date=29102026, Supplier=LCSC
VR1: library part Pot_20k_1/2W_TH_TM, "TRIMMER 20K OHM 0.5W PC PIN TOP", Manufacturer="Bourns Inc.", Manufacturer Part Number=3296W-1-203LF, Supplier Part Number 1=3296W-203LF-ND, Last modified by=J.Jaramillo, Last modified date=20240310, Reel stock=N/A, Supplier 1=Digi-Key

## Via types
v1: diameter 50, hole 28, Top Layer to Bottom Layer, 26 vias
v2: diameter 28, hole 28, Top Layer to Bottom Layer, 6 vias

## Nets (pads, with @x,y where several pads share a name; then routed paths per layer and width w, separated by ;. In a path a pad name is that pad's centre, name@x,y a point inside that pad or via, vN(x,y) a via of type N, cw(c..) or ccw(c..) an arc to the next point about the centre after c; other vN are vias at no path point)
GND: C1.2 C2.2 C3.2 C4.2 C6.2 C7.2 C8.2 C9.2 C11.2 C12.2 C13.2 C14.2 C16.2 C17.2 C18.2 C19.2 C20.2 C21.2 C22.2 C23.2 C25.2 C27.1 C28.1 D1.4 D2.2 J2.1 J3.1 J4.1 J5.1 J6.1 L5.2 R1.1 R3.1 R5.1 R7.1 R9.1 R10.2 R13.1 U1.1 U2.1 U3.1 U4.4 U4.7
Net12V_1: 12V.1 C6.1 C7.1 F1.1 L1.2 R2.2 | length 9361.8
  Top Layer w46: F1.1 621.67,2505.3 789.7,2505.3 v1(790,2505) ; v1(3365,2210) 3365,2062.38 L1.2 ; v1(4870,1880) 4871.08,1880 4872.78,1881.69 C7.1 ; C7.1@4971.35,1881.69 4973.94,1879.1 4973.94,1471.06 5050,1395 5175,1395 5240,1330 5240,625 5303,562 C6.1 ; C7.1@4973.94,1881.69 5175,1680.63 12V.1 v1(5280,1675)
  Bottom Layer w46: v1(790,2505) 4450,2505 5072.5,1882.5 v1(5280,1675) ; v1(3365,2210) 4540,2210 v1(4870,1880)
Net24V_1: 24V.1 C1.1 C2.1 C3.1 C4.1 C5.1 C8.1 C9.1 C10.1 C13.1 C14.1 C15.1 C18.1 C19.1 C22.1 C23.1 C25.1 C26.1 D1.3 R1.2 U1.5 U2.5 U3.5 U4.2 U5.1 | length 17583
  Top Layer w10: U1.5 U1.5@4320.2,1963.99 ; 4674.75,2072.35 4682.4,2080
  Top Layer w46: R1.2 1600,185 1545,240 1545,760.14 C1.1 ; v1(3570,3625) 3570,4250 v1(3640,4320) ; v1(4190,6155) 4190.57,6155.57 4190.57,6319.44 U5.1 ; U3.5 4314.08,4073.86 4314.72,4074.5 C15.1 v1(4880,4250) ; U2.5 4268.39,2989.36 v1@4604.36,2989.36 ; U1.5@4320.2,1963.99 4436.2,2080 4674.75,2080 ; U4.2 4585,4620 ; v1(4605,2990) 4605.77,2989.23 4818.77,2989.23 C10.1@4821.88,2986.12 ; 4682.4,2080 v1(4775,2080) ; v1(4690,6385) 4690.77,6384.23 4842.76,6384.23 C26.1 4853.49,6373.51 4911.49,6373.51 5315,5970 C25.1 5700.23,5761.31 5690,5751.08 v1(5690,5750) ; v2(4765,1445) v1(4765,1525) ; C5.1 4770,2073.92 4774.23,2078.15 v1@4774.23,2078.92 ; v1(4775,2305) v1(4775,2080) ; v1(4820,1260) v2(4820,1340) ; C10.1 C14.1 ; C23.1 5071.5,4883.5 5610,4345 ; v1(5560,1300) 5561.08,1300 5562.82,1298.26 C8.1 ; v1(5710,4125) 5710,4126.08 5705.23,4130.85 C22.1 5610,4345 ; C18.1 5690.57,3748.26 5362.33,4076.51 5312,4076.51 C19.1 5304.09,4074.5 5128.6,4250 v1(4880,4250) ; C13.1 5730.71,1973.13 5180.14,1973.13 C9.1 5174.1,1973 5067.09,2080 v1(4775,2080) ; 4585,4620 4585,4295 4630,4250 v1(4880,4250) ; 4585,4620 4860,4345 5610,4345
  Bottom Layer w46: v1(3570,3625) 3571.08,3625 3586.08,3610 3985,3610 v1(4605,2990) 4605,2475 v1(4775,2305) ; v1(3640,4320) 4192.04,4320 4193.04,4321 4809,4321 v1(4880,4250) ; v1(4190,6155) 4585,6155 4690,6260 v1(4690,6385) ; v1(4820,1260) 5518.92,1260 v1@5558.92,1300 ; v1(5690,5750) 5545,5605 5545,4290 v1(5710,4125)
  other v2: 4765,1340 4765,1385 4820,1385 4820,1430
"Net  U3_2": R6.1 R7.2 U3.2 | length 969.7
  Top Layer w10: U3.2 4858.39,3873.07 5030.1,3701.37 5030.1,3697.62 R7.2 R6.1
"Net  U3_3": L3.1 U3.3 | length 1398.4
  Top Layer w46: L3.1 3479.77,3745.85 3483.92,3750 v1(3485,3750) ; U3.3 4263,3939.64 4379.28,3939.64 4383.92,3935 v1(4385,3935)
  Bottom Layer w46: v1(3485,3750) 3610,3750 3648,3712 4337,3712 4385,3760 v1(4385,3935)
"Net  U3_4": C15.2 U3.4 | length 641.6
  Top Layer w46: U3.4 4263,4006.57 4458.43,4006.57 4516.5,3948.5 C15.2
NetC5_2: C5.2 U1.4 | length 520.2
  Top Layer w10: U1.4 4677.94,1897.06 4720,1855 4768.01,1855 C5.2
NetC10_2: C10.2 U2.4 | length 583.9
  Top Layer w46: U2.4 4532.5,2922.06 4597.57,2857 C10.2
NetC11_1: C11.1 C12.1 F2.1 L2.2 R4.2 T201.1 | length 6490.6
  Top Layer w46: F2.1 622.56,3080 810,3080 1070,3340 3093,3340 3330.63,3102.36 L2.2 ; L2.2@3366.07,3102.36 3603.7,3340 5095,3340 T201.1 ; 5219.53,2595 C11.1 5450,2887 5450,2975 5445,2980 C12.1
NetC16_1: C16.1 C17.1 F3.1 L3.2 R6.2 T300.1 | length 6340.8
  Top Layer w46: F3.1 621.97,3690 745,3690 1470,4415 3201.7,4415 3323.35,4293.35 L3.2 3503.22,4155.7 3508.92,4150 v1(3510,4150) ; v1(4990,4070) 4991.08,4070 4993,4071.91 5082.41,4071.91 C17.1 5087.59,4071.91 5149.59,4071.91 5187.11,4034.4 5187.11,3686.92 5189.03,3685 T300.1 5335,3516.65 C16.1
  Bottom Layer w46: v1(3510,4150) 4910,4150 v1(4990,4070)
NetC20_1: C20.1 C21.1 F4.1 L4.1 R8.2 T301.1 | length 6174.8
  Top Layer w46: F4.1 624.06,4262.91 701.09,4262.91 704,4260 750,4260 1060.84,4570.84 3242.14,4570.84 3303.35,4632.05 L4.1 3549.19,4799.19 T301.1 3836.5,5086.5 R8.2 4163.5,5130 5340,5130 5590,4880 5699.85,4880 5705.23,4885.39 C21.1
NetC24_1: C24.1 U4.3 | length 214.7
  Top Layer w10: U4.3 4845,4735 4855,4725 4976.5,4725 C24.1
NetC24_2: C24.2 D2.1 L4.2 U4.1 | length 2683.6
  Top Layer w10: U4.1 4855,4635 4868.5,4648.5 C24.2
  Top Layer w46: L4.2 3307.38,5205 3425,5205 3602.64,5382.64 4700.38,5382.64 4727.33,5355.69 4727.33,5286.26 D2.1
  Bottom Layer w46: D2.1 4856.18,5269.89 4905,5221.07 4905,4665 4875,4635 U4.1
NetC26_2: C26.2 C27.2 C28.2 D3.2 F5.1 R12.1 T400.1 U5.3 | length 8244
  Top Layer w46: F5.1 647.32,5060 805,5060 1605,5860 T400.1 ; R12.1 3986.5,5878.5 3955,5910 3955,6022.05 3981.95,6049 4239,6049 4325,6135 U5.3 4325,6482.7 4351.95,6509.64 4684.64,6509.64 v1(4685,6510) ; C26.2 4687,6508 v1(4685,6510) ; C27.2 4908.85,6793.85 4805,6690 4711.95,6690 4685,6663.05 v1(4685,6510)
  Bottom Layer w46: T400.1 3505,5870 3505,6555 3545,6595 3870,6595 3921.3,6646.3 D3.2 3926.41,6755 4028.05,6755 4055,6728.05 4055,6315 4160,6210 4535,6210 4605,6280 4605,6430 v1(4685,6510)
NetD1_1: D1.1 J1.1
NetD1_2: D1.2 J1.2
NetD3_1: D3.1 L5.1 U5.2 | length 1288.7
  Top Layer w46: D3.1 3721.3,6545.35 3724.1,6542.55 3724.1,6520.9 3748.35,6496.65 L5.1 3961.4,6496.65 3995,6463.05 3995,6210 4104,6101 4212.37,6101 4258.07,6146.7 U5.2
NetF1_2: F1.2 J2.2 | length 498.5
  Top Layer w46: J2.2 403.57,2498.57 615.01,2710.01 653.12,2710.01 656.04,2707.09 665.94,2707.09 F1.2
NetF2_2: F2.2 J3.2 | length 483.7
  Top Layer w46: J3.2 381.57,3086.57 572.32,3277.32 665.94,3277.32 F2.2
NetF3_2: F3.2 J4.2 | length 486
  Top Layer w46: J4.2 377.57,3702.57 564.41,3889.41 F3.2
NetF4_2: F4.2 J5.2 | length 474.8
  Top Layer w46: J5.2 420.76,4304.57 580.59,4464.41 F4.2
NetF5_2: F5.2 J6.2 | length 390.9
  Top Layer w46: J6.2 597.28,4906.57 611.54,4892.32 F5.2
NetL1_1: L1.1 U1.3 | length 1475.7
  Top Layer w46: L1.1 3373.35,1497.73 3375,1496.08 v1(3375,1495) ; U1.3 4408.78,1830.14 4413.92,1825 v1(4415,1825)
  Bottom Layer w46: v1(3375,1495) 4085,1495 v1(4415,1825)
NetL2_1: L2.1 U2.3 | length 1440.3
  Top Layer w46: L2.1 3556.44,2692.52 3563.92,2700 v1(3565,2700) ; U2.3 4388.78,2855.14 4393.92,2850 v1(4395,2850)
  Bottom Layer w46: v1(3565,2700) 3655,2610 4368.05,2610 4395,2636.95 v1(4395,2850)
NetR2_1: R2.1 R3.2 U1.2 | length 694.6
  Top Layer w10: U1.2 4718.26,1763.21 4775.91,1705.56 4775.91,1701.81 R3.2 R2.1
NetR4_1: R4.1 R5.2 U2.2 | length 986.5
  Top Layer w10: U2.2 4843.26,2788.21 5020.1,2611.37 5020.1,2607.62 R5.2 R4.1
NetR8_1: R8.1 VR1.2 VR1.3 | length 412.2
  Top Layer w10: R8.1 4123.5,5020 4155,5020 4205,4970 VR1.3 VR1.2
NetR9_2: R9.2 U4.6 VR1.1 | length 1082.5
  Top Layer w10: VR1.1 4300,4565 4325,4590 4325,5081.02 4324.52,5081.5 ; R9.2 4324.52,5081.5 ; U4.6 4465,4885 4430,4920 4430,5055 4403.5,5081.5 4324.52,5081.5
NetR10_1: R10.1 R11.2 | length 195
  Top Layer w10: R11.2 R10.1
NetR11_1: R11.1 R12.2 U5.4 | length 647
  Top Layer w10: R12.2 4265,5941.5 R11.1 4271.5,5946.5 4285,5960 4285,5961.5 4391.93,6068.43 U5.4
NetR13_2: R13.2 U5.5 | length 522
  Top Layer w10: U5.5 4458.86,6091.14 4608.5,5941.5 R13.2
pads on no net: L1.3 L2.3 L3.3 L4.3 U1.6 U2.6 U3.6 U4.5 U5.6

## Polygon pours and split planes (outlines as drawn)
GND on Top Layer "GND_L01_P010" (solid, remove dead copper, pour order 10): 0,2361.52 0,6923.73 6141.73,6923.73 6141.73,0 942.4,0 942.4,2361.52
Net24V_1 on Top Layer "NET24V_1_L01_P003" (solid, remove dead copper, pour order 3): 1010,1185 4615,1185 4615,1450 4645,1480 4830,1480 4860,1450 4860,900 4830,870 1030,870 970,930 970,1145
NetD1_2 on Top Layer "NETD1_2_L01_P001" (solid, remove dead copper, pour order 1): 205,1920 185,1900 185,1045 265,965 585,965 610,990 610,1060 565,1105 400,1105 350,1155 350,1895 325,1920
NetD1_1 on Top Layer "NETD1_1_L01_P002" (solid, remove dead copper, pour order 2): 580,1995 690,1885 690,655 630,595 440,595 385,540 385,410 405,390 730,390 845,505 845,2015 685,2175 230,2175 180,2125 180,2025 210,1995
GND on Bottom Layer "GND_L02_P023" (solid, remove dead copper, pour order 23): 0,2359.84 0,6929.13 6141.73,6929.13 6141.73,0 943.99,0 905,0 905,2360 0.16,2360
Net24V_1 on Bottom Layer "NET24V_1_L02_P019" (solid, remove dead copper, pour order 19): 5085,1135 5145,1195 5340,1195 5395,1250 5395,1380 5330,1445 5148.43,1445 5085,1508.43 5085,2065 5120,2100 5455,2100 5510,2155 5510,2435 5465,2480 5040,2480 4970,2550 4970,3060 5030,3120 5495,3120 5585,3210 5585,3530 5580,3530 5525,3585 5075,3585 4915,3745 4915,4175 5110,4370 5440,4370 5450,4370 5495,4415 5495,6050 5300,6237.31 4797.74,6237.31 4755.05,6280 4755.05,6730.8 4720,6760 4620,6760 4595,6735 4595,6270 4560,6235 4135,6235 4105,6205 4105,6060 4145,6020 5000,6020 5075,5945 5075,4620 5005,4550 4520,4550 4500,4530 4500,965 4575,890 5015,890 5085,960

## Other copper
Top Layer:
  text "-12V" at 460,5190 h60 r270
  text "ADJ" at 455,4645 h60 r270
  text "3.3V" at 445,4110 h60 r270
  text "5V" at 460,3410 h60 r270
  text "+12V" at 445,2880 h60 r270

## Silkscreen, mask and mechanical layers (free items; w line width, h text height)
Mechanical 1:
  lines w10: 942.4,0.06 942.4,2357.6 940,2360 0.16,2360 0,2359.84 0,6929.13 6141.73,6929.13 ; 943.99,0 6141.73,0 6141.73,6929.13 ; 6141.73,6929.13 6141.73,6929.13
Mechanical 2:
  circle w0.5: c5944.88,196.85 r81.38
  circle w0.5: c196.85,196.85 r81.38
  circle w0.5: c196.85,6732.28 r81.38
  circle w0.5: c5905.47,6376.59 r81.38

## Text inside footprints (layer, text, board x,y; h text height)
C1: Top Overlay "+" at 1675.63,1166.36 h100
C2: Top Overlay "+" at 2700.63,1166.36 h100
C3: Top Overlay "+" at 3655.63,1166.36 h100
C4: Top Overlay "+" at 4665.63,1166.36 h100
C20: Top Overlay "+" at 5626.57,5053.46 h60 r270
C21: Top Overlay "+" at 5631.81,5593.46 h60 r270
C22: Top Overlay "+" at 5631.81,4528.46 h60 r270
C25: Top Overlay "+" at 5626.81,6153.46 h60 r270